# Altium PCB 9269_PCB1.PcbDoc (part 2 of 2)
Units mil, origin at the board's own origin, x right, y up, seen from the top; angles counter-clockwise.
Board outline 2770 x 5319.52 mil, 2 copper layers (Top Layer, Bottom Layer), stack 62.2 mil thick; 87 components, 63 nets, 294 pads, 108 vias.
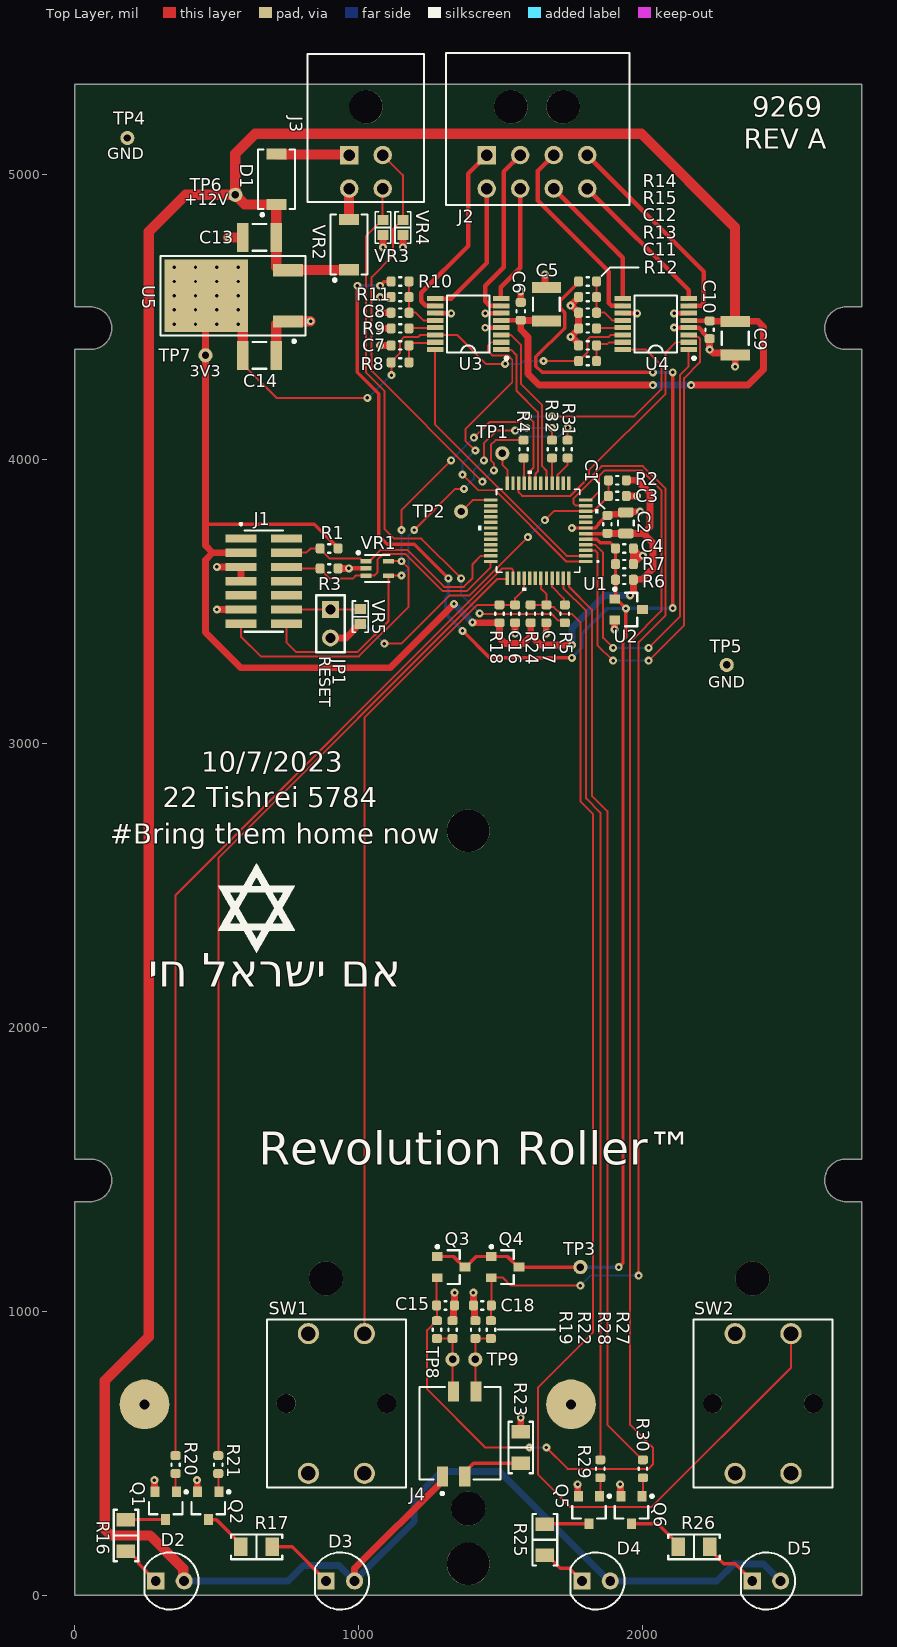
[diagram p0: Top Layer view]

## Part data (continued)
VR1: "ESDALC Series 4 Channel 6.1V Uni-Directional Transil ESD Protection SOT-323-5L", Breakdown Voltage=7.2V, Case/Package=SOT-323, Leakage Current=1uA, Manufacturer=STMicroelectronics, Manufacturer Part Number=ESDALC6V1W5, Max Operating Temperature=150°C, Max Power Dissipation=25W, Min Breakdown Voltage=6.1V, Min Operating Temperature=-40°C, Operating Supply Voltage=3V, Package Quantity=3000, Peak Pulse Current=15A, Power Line Protection=No, Supplier Part Number 1=511-ESDALC6V1W5, Test Current=1mA, Category="TVS Diodes", Depth=1.35mm, Diode Type=ZENER, Direction=Unidirectional, ESD Protection=Yes, Height=1mm, Lead Free="Lead Free", Length=2.2mm, Max Breakdown Voltage=7.2V, Max Reverse Leakage Current=1uA, Mounting Technology="Surface Mount", Number of Channels=4, Number of Elements=4, Number of Unidirectional Channels=4, Packaging="Tape and Reel", Peak Pulse Power=25W, Pins=5, Polarity=Unidirectional, Pricing 1="1=0.36, 10=0.282, 50=0.282, 100=0.17, 1000=0.146, 10000=0.084 (USD)", Radiation Hardening=No, Reach SVHC Compliant=No, Reverse Breakdown Voltage=6.1V, Reverse Standoff Voltage=3V, RoHS=Yes, RoHS Compliant=Yes, Series="ESDA, TRANSIL™", Stock 1=2738, Supplier 1=Mouser, Termination=SMD/SMT, Voltage Rating (DC)=6.1V, Weight=0.00019oz, Width=1.35mm, Working Voltage=3V
VR2: library part "TVS Diode Unidirectional", "400 W 12 V Uni Directional Surface Mount Transient Voltage Suppressor Diode", Breakdown Voltage=14.7V, Case/Package=SMA, Clamping Voltage=19.9V, Current=201A, Leakage Current=1uA, Manufacturer="Vishay Semiconductors", Manufacturer Part Number=SMAJ12A-E3/61, Max Forward Surge Current (Ifsm)=40A, Max Operating Temperature=150°C, Max Power Dissipation=400W, Max Surge Current=20.1A, Min Breakdown Voltage=13.3V, Min Operating Temperature=-55°C, Operating Supply Voltage=12V, Package Quantity=1800, Power Line Protection=No, Supplier Part Number 1=625-SMAJ12A-E3, Test Current=1mA, Category="TVS Diodes", Clamping Voltage-Max=19.9V, ComponentLink1Description=https://datasheet.ciiva.com/26322/548547-26322536.pdf?src-supplier=Element14, ComponentLink1URL=https://datasheet.ciiva.com/26322/548547-26322536.pdf?src-supplier=Element14, ComponentLink2Description=https://datasheet.ciiva.com/16199/smaj50a-16199669.pdf?src-supplier=Future+Electronics, ComponentLink2URL=https://datasheet.ciiva.com/16199/smaj50a-16199669.pdf?src-supplier=Future+Electronics, ComponentLink3Description=https://datasheet.ciiva.com/28409/548547-28409622.pdf?src-supplier=Element14, ComponentLink3URL=https://datasheet.ciiva.com/28409/548547-28409622.pdf?src-supplier=Element14, Diode Type=ZENER, Direction=Unidirectional, Height=2.09mm, Lead Free="Lead Free", Length=4.5mm, Max Breakdown Voltage=14.7V, Max Reverse Leakage Current=1uA, Number of Channels=1, Number of Elements=1, Number of Unidirectional Channels=1, Packaging="Tape and Reel", Peak Pulse Current=20.1A, Peak Pulse Power=400W, Pins=2, Polarity=Unidirectional, Power Dissipation=400W, Pricing 1="1=0.42, 10=0.302, 50=0.302, 100=0.137, 1000=0.091, 1800=0.077, 9000=0.07, 10000=0.07, 23400=0.065, 48600=0.063 (USD)", Radiation Hardening=No, Reach SVHC Compliant=Unknown, Reverse Breakdown Voltage=13.3V, Reverse Standoff Voltage=12V, RoHS=Yes, RoHS Compliant=Yes, Series=TransZorb®, Stock 1=44832, Supplier 1=Mouser, Termination=SMD/SMT, Voltage=12V, Voltage Rating (DC)=12V, Width=2.79mm
VR3 VR4 VR5: "ESD Suppressor Multilayer Varistor 5V Automotive 2-Pin Case 0603(1608Metric) T/R", Case Code (Imperial)=0603, Case Code (Metric)=1608, Clamping Voltage=20V, Current Rating=50nA, Manufacturer=Bourns, Manufacturer Part Number=CG0603MLC-05E, Max Operating Temperature=85°C, Max Voltage Rating (DC)=5V, Min Operating Temperature=-40°C, Package Quantity=1, Supplier Part Number 1=652-CG0603MLC-05E, Voltage Rating (AC)=8V, Case/Package=0603, Category=Varistors, ComponentLink1Description=https://datasheet.ciiva.com/1278/1785244-1278701.pdf?src-supplier=Element14, ComponentLink1URL=https://datasheet.ciiva.com/1278/1785244-1278701.pdf?src-supplier=Element14, ComponentLink2Description=https://datasheet.ciiva.com/22696/1785244-22696318.pdf?src-supplier=Element14, ComponentLink2URL=https://datasheet.ciiva.com/22696/1785244-22696318.pdf?src-supplier=Element14, ComponentLink3Description=https://datasheet.ciiva.com/8084/mlc-8084047.pdf?src-supplier=Avnet, ComponentLink3URL=https://datasheet.ciiva.com/8084/mlc-8084047.pdf?src-supplier=Avnet, ComponentLink4Description=https://datasheet.ciiva.com/6991/mlc-6991836.pdf?src-supplier=Digikey, ComponentLink4URL=https://datasheet.ciiva.com/6991/mlc-6991836.pdf?src-supplier=Digikey, ComponentLink5Description=https://datasheet.ciiva.com/6991/mlc-6991832.pdf?src-supplier=Digikey, ComponentLink5URL=https://datasheet.ciiva.com/6991/mlc-6991832.pdf?src-supplier=Digikey, Contact Plating=Tin, Depth=0.8mm, Leakage Current=50nA, Length=1.6mm, Number of Channels=1, Number of Circuits=1, Operating Supply Voltage=5V, Packaging="Tape and Reel", Pins=2, Pricing 1="1=0.36, 10=0.232, 50=0.232, 100=0.139, 1000=0.1, 5000=0.094, 10000=0.086, 25000=0.08, 50000=0.072, 100000=0.069 (USD)", Radiation Hardening=No, Reach SVHC Compliant=No, RoHS=Yes, RoHS Compliant=Yes, Series=MLC, Stock 1=20474, Supplier 1=Mouser, Termination=SMD/SMT, Thickness=0.8mm, Voltage=5V, Voltage Rating (DC)=5V, Width=0.8mm, Working Voltage=5V

## Free pads (board coordinates)
  round 150 hole 150 unplated: 1(1385,110) 3(1385,2691)
  round 120 hole 120 unplated: 2(1385,305) 6(884,1115) 7(2386,1115)
  round 175 hole 35 paste-87.5: 4(245,672) 5(1747,672)

## Via types
v1: diameter 28, hole 12, Top Layer to Bottom Layer, tented both sides, 108 vias

## Nets (pads, with @x,y where several pads share a name; then routed paths per layer and width w, separated by ;. In a path a pad name is that pad's centre, name@x,y a point inside that pad or via, vN(x,y) a via of type N, cw(c..) or ccw(c..) an arc to the next point about the centre after c; other vN are vias at no path point)
3V3: C1.2 C2.2 C14.2 J1.3 R1.1 R2.1 R6.1 R8.1 R12.1 R18.2 R24.2 TP7.1 U1.6 U3.14 U4.14 U5.3@462.6,4574.45 | length 6406.5
  Top Layer w7: C14.2 590.94,4333.5 607.13,4317.32 607.68,4317.32 710,4215 v1(1030,4215) ; v1(1115,4295) 1114.25,4295.75 1114.25,4339.25 R8.1 1113.5,4341.97 1145,4373.46 1145,4415 1160,4430 1210,4430 1216.61,4436.61 1345.8,4436.61 1447.42,4335 v1(1515,4335) ; v1(1650,4345) 1773.9,4345 1805,4376.1 1805,4420 1815,4430 1880,4430 1886.61,4436.61 U4.14
  Top Layer w12: 460,3775 465,3770 843.46,3770 926.5,3686.97 R1.1 ; U1.6 1873.98,3737.48 C1.2
  Top Layer w24: U5.3@462.6,4574.45 460,4571.85 TP7.1 460,3775 460,3695 485,3670 ; J1.3 485,3670 ; v1(1335,3490) 1110,3265 585,3265 460,3390 460,3645 485,3670 ; v1(1400,3425) 1401.08,3425 1402.58,3423.5 R18.2 1495,3370 1515.06,3349.94 1534.94,3349.94 1535,3350 1580,3350 1605,3375 ; R24.2 1605,3375 ; v1(1750,3345) 1640,3345 1610,3375 1605,3375 ; C1.2 1875.45,3738.05 1939.55,3738.05 C2.2 2002.4,3737.6 ; R2.1 1980,3925 2025,3880 2025,3760.2 2002.4,3737.6 ; v1(1955,3520) 1955,3521.08 1966.5,3532.58 R6.1 1968.13,3576.63 1996.63,3576.63 2035,3615 2035,3705 2002.4,3737.6
  Top Layer w36: U5.3@462.6,4574.45 480.99,4574.45 590.94,4464.5 C14.2
  Bottom Layer w7: v1(1030,4215) 1032.5,4215 1112.5,4295 v1(1115,4295) ; v1(1515,4335) 1570.49,4335 1580.49,4345 v1(1650,4345)
  Bottom Layer w24: v1(1335,3490) v1(1400,3425) ; v1(1750,3345) 1750,3405 1864.23,3519.23 1954.23,3519.23 v1(1955,3520)
  other v1: 350,4475 425,4475 500,4475 575,4475 350,4525 425,4525 500,4525 575,4525 350,4575 425,4575 500,4575 575,4575 350,4625 425,4625 500,4625 575,4625 350,4675 425,4675 500,4675 575,4675
12V: C5.2 C6.2 C9.2 C10.2 C13.2 D1.1 D2.2 D3.2 D4.2 D5.2 J4.1 TP6.1 U3.5 U4.5 U5.2 VR2.1 | length 13138.6
  Top Layer w16: U3.5 U3.5@1501.5,4488.15 ; U3.5@1502,4488.65 U3.5@1501.5,4488.15 ; C6.2@1572.84,4491.35 C6.2 1569.65,4488.15 U3.5@1501.5,4488.15 ; U4.5 2161.58,4487.35 C10.2@2234.14,4487.35
  Top Layer w24: D3.2 985,93.7 1293.94,402.65 J4.1 ; C6.2@1568.78,4489.72 C6.2 ; C5.2@1625,4478.26 C5.2@1632.69,4485.94 ; C5.2 1658.72,4487.22 1571.28,4487.22 C6.2 ; v1(2035,4260) 1635,4260 1595,4300 1595,4430 1570,4455 C6.2 ; v1(2170,4260) 2370,4260 2425,4315 2425,4465 2405,4485 C9.2@2324.06,4485 ; C10.2 2236.22,4485.28 2323.78,4485.28 C9.2@2324.06,4485 ; C9.2 C9.2@2324.06,4485
  Top Layer w36: D2.2 381.6,53.4 381.6,93.4 265,210 126.09,210 105,231.09 105,755 260,910 260,4800 390,4930 TP6.1 ; VR2.1 964.29,4665.71 750.71,4665.71 U5.2 718.5,4665 709.06,4674.45 C13.2 709.53,4780.47 709.53,4895.94 D1.1 598.58,4896.42 TP6.1 ; C9.2@2323.78,4485.28 2323.78,4816.22 1995,5145 635,5145 565,5075 TP6.1
  Bottom Layer w24: D2.2 750,50 805,105 930,105 D3.2 1195,260 1195,340 1290,435 1495,435 1880,50 D4.2 2260,50 2320,110 2425,110 D5.2 ; v1(2035,4260) v1(2170,4260)
AGITATOR1+: J2.1 U3.10 | length 665.9
  Top Layer w16: U3.10 1268,4539.83 1234.98,4539.83 1220,4554.81 1220,4585 1385,4750 1385,5005 J2.1
AGITATOR1-: J2.5 U3.9 | length 495.1
  Top Layer w16: U3.9 1324.57,4564.57 1450,4690 J2.5
AGITATOR2+: J2.3 U4.10 | length 700.6
  Top Layer w16: J2.3 1630,5014 1630,4910 1880,4660 1880,4549.21 1889.37,4539.83 1928,4539.83 U4.10
AGITATOR2-: J2.7 U4.9 | length 488
  Top Layer w16: J2.7 1928.86,4709.14 U4.9
AUGER1+: J2.2 U3.7 | length 628.7
  Top Layer w16: U3.7 1500.28,4539.83 1460.17,4539.83 1445,4555 1445,4610 1510,4675 1510,5012 J2.2
AUGER1-: J2.6 U3.8 | length 416.2
  Top Layer w16: U3.8 1500.86,4564.57 1500,4565.43 1500,4605 1568,4673 J2.6
AUGER2+: J2.4 U4.7 | length 748.7
  Top Layer w16: J2.4 2215,4659 2215,4550 2204.83,4539.83 2162,4539.83 U4.7
AUGER2-: J2.8 U4.8 | length 535.4
  Top Layer w16: J2.8 2161.14,4594.86 U4.8
GND: C1.1 C2.1 C3.1 C4.1 C5.1 C6.1 C7.1 C8.1 C9.1 C10.1 C11.1 C12.1 C13.1 C14.1 C15.1 C16.1 C17.1 C18.1 J1.5 J1.7 J1.11 J3.3 JP1.2 Q1.2 Q2.2 Q5.2 Q6.2 R3.2 R7.1 R9.2 R11.1 R13.2 R15.1 R22.2 R23.1 R28.2 SW1.3 SW2.3 TP4.1 TP5.1 U1.7 U2.2 U3.4 U3.6 U3.11 U4.4 U4.6 U4.11 U5.1 VR1.2 VR2.2 VR3.2 VR4.2 VR5.2 | length 2958.1
  Top Layer w12: v1(1750,3757) 1750.17,3757.17 U1.7 1832.17,3757.17 1845,3770 1845,3773.46 1873.03,3801.5 C1.1
  Top Layer w16: v1(965,3615) VR1.2 ; U3.11@1269.24,4513 v1(1325,4513) ; C15.1 C15.1@1336.75,1020.25 ; v1@1336.75,1064.75 v1(1337,1065) ; v1(1445,4462) U3.4@1500.94,4462 ; v1@1445,4510 1448.39,4513.39 U3.6 U3.6@1502,4514.24 ; C6.1@1568.03,4551.5 C6.1 ; U4.11 1929.05,4513.19 1979.81,4513.19 v1(1980,4513) ; v1(2110,4463) 2110.4,4462.6 2160.74,4462.6 U4.4 2162,4461.35 2198.65,4461.35 2210,4450 2210,4446.54 2233.03,4423.5 C10.1 ; v1(2110,4513) 2110.19,4513.19 2160.95,4513.19 U4.6
  Top Layer w24: v1(280,405) 280.77,404.23 280.77,365.46 Q1.2 ; v1(430,405) 430.77,404.23 430.77,365.46 Q2.2 ; v1(500,3470) J1.11 ; v1(500,3620) J1.5 J1.7 ; JP1.2 954.61,3370 1003.03,3418.43 VR5.2 ; R3.2 v1(965,3615) ; v1(1075,4400) C7.1 ; v1(1075,4460) R9.2 ; v1(1075,4515) C8.1 ; v1(1075,4570) R11.1 ; v1(1085,4745) VR3.2 ; v1(1155,4745) VR4.2 ; R22.2 1333.25,969.74 1333.25,1016.75 C15.1 ; C15.1@1336.75,1020.25 v1@1336.75,1064.75 ; v1(1403,1065) 1403.25,1064.75 1403.25,1020.25 C18.1 1406.75,1016.75 1406.75,969.74 R28.2 ; v1(1550,3385) C16.1 ; C6.1@1568.03,4551.5 1570,4553.46 v1(1570,4590) ; R23.1 v1(1570,625) ; v1(1655,4650) 1655,4609.06 C5.1 ; v1(1660,3385) C17.1 ; v1@1745.77,4540.77 v1(1745,4540) ; v1(1770,390) 1770.77,389.23 1770.77,350.46 Q5.2 ; C11.1 C11.1@1773.5,4401.97 ; C11.1@1773.5,4406.97 1751.24,4429.23 1745.77,4429.23 v1(1745,4430) 1745.47,4430 1773.5,4458.03 R13.2 C12.1 1773.5,4516.97 1751.24,4539.23 1745.77,4539.23 v1(1745,4540) ; R15.1 1773.5,4568.03 1745.47,4540 v1(1745,4540) ; C1.1 1878.75,3805.24 1923,3805.24 1930.16,3812.4 C2.1 1941.83,3814.23 1989.23,3814.23 v1(1990,3815) ; v1(1900,3400) U2.2@1900,3431.22 ; v1(1920,390) 1920.77,389.23 1920.77,350.46 Q6.2 ; C3.1 v1(1980,3870) ; C4.1 C4.1@1966.5,3683.03 ; C10.1 v1(2235,4385) 2236.08,4385 2247.45,4373.63 2317.31,4373.63 C9.1 v1(2325,4325) ; C4.1@1966.5,3683.03 R7.1 1966.5,3631.97 1993.76,3659.23 1999.23,3659.23 v1(2000,3660) 1999.23,3660.77 1988.76,3660.77 C4.1@1966.5,3683.03
  Top Layer w36: v1(540,4780) C13.1 ; C14.1 709.05,4474.45 718.5,4483.9 U5.1 751.1,4485 v1(830,4485) ; VR2.2@965,4848.58 965.5,4849.08 965.5,4951.5 J3.3
  other v1: 1445,4513
NetC7_2: C7.2 R8.2 U3.15 | length 149.9
  Top Layer w7: R8.2@1176.5,4345 C7.2 C7.2@1179.51,4403.01 ; C7.2@1179.51,4408.01 1265.85,4408.01 U3.15
NetC8_2: C8.2 R10.2 R11.2 U3.12 | length 213.6
  Top Layer w7: R10.2 R11.2 C8.2 1200,4515 1225,4490 1227.2,4487.8 U3.12
NetC11_2: C11.2 R12.2 U4.15 | length 154.7
  Top Layer w7: R12.2 C11.2 1841.5,4405 1875,4405 1880,4410 U4.15@1927.83,4410 ; U4.15@1925.85,4408.01 U4.15@1927.83,4410 ; U4.15 U4.15@1927.83,4410
NetC12_2: C12.2 R14.2 R15.2 U4.12 | length 213.6
  Top Layer w7: R14.2 R15.2 C12.2 1865,4515 1890.02,4489.98 1892.2,4487.8 U4.12
NetC15_2: C15.2 Q3.2 R19.1 U1.12 | length 5207.2
  Top Layer w7: Q3.2 1273.5,1114.72 C15.2 1274.25,1019.25 1274.25,967.24 R19.1 1273.03,966.5 1240,933.46 1240,725 1445,520 v1(1600,520) ; v1(1660,520) 1735,445 2020,445 2035,460 2035,520 1955,600 1955,3355 2065,3465 2065,3890 1995,3960 1865,3960 1845,3940 1845,3884.67 1815.93,3855.59 U1.12
  Bottom Layer w7: v1(1600,520) v1(1660,520)
NetC16_2: C16.2 R18.1 SW1.1 U1.40 | length 2970.4
  Top Layer w7: SW1.1 1019.43,3089.83 1416.09,3486.5 R18.1 C16.2 1550,3510 1581.89,3541.89 U1.40
NetC17_2: C17.2 R24.1 SW2.1 U1.43 | length 4663.5
  Top Layer w7: R24.1 C17.2 ; U1.43 1640.94,3544.06 1660,3525 C17.2 ; SW2.1 2521.43,801.43 2030,310 1745,310 1630,425 1630,730 1825,925 1825,2750 1780,2795 1780,3425 1750,3455 1710,3455 1686.6,3478.4 1668.1,3478.4 C17.2
NetC18_2: C18.2 Q4.2 R27.1 U1.11 | length 3982.4
  Top Layer w7: R27.1 1465.75,967.24 1465.75,1019.25 C18.2 1466.5,1117.48 Q4.2 1507.4,1117.6 1535,1090 v1(1780,1090) ; U1.11 1764.09,3835.91 1755,3845 1755,3860 1825,3930 1825,3945 1855,3975 2000,3975 2080,3895 2080,3450 1985,3355 v1(1985,1125)
  Bottom Layer w7: v1(1780,1090) 1815,1125 v1(1985,1125)
NetD1_2: D1.2 J3.1 | length 255
  Top Layer w36: D1.2@711.79,5071.79 J3.1@964.21,5071.79
  Top Layer w48: J3.1@964.21,5071.79 J3.1
NetD2_1: D2.1 R16.2 | length 153.6
  Top Layer w12: R16.2 188.86,154.88 225,118.74 225,110 D2.1
NetD3_1: D3.1 R17.2 | length 239.6
  Top Layer w12: R17.2 765,170 D3.1
NetD4_1: D4.1 R25.2 | length 167.2
  Top Layer w12: R25.2 1663.86,139.88 1708.74,95 1740,95 D4.1
NetD5_1: D5.1 R26.2 | length 205.5
  Top Layer w12: R26.2 2252.74,152.38 2252.74,142.26 2285,110 2325,110 D5.1
NetJ1_13: J1.13 R32.2 VR1.5 | length 1842.8
  Top Layer w7: J1.13 584.88,3375.12 655,3305 1000,3305 1175,3480 1175,3615 v1(1150,3640) 1149.7,3640.3 VR1.5@1116.18,3640.3 ; VR1.5 VR1.5@1116.18,3640.59 ; v1(1150,3750) 1150,3820 v1(1325,3995) ; v1(1405,4075) 1460,4130 1570,4130 v1(1590,4110) ; R32.2 v1(1680,4110)
  Bottom Layer w7: v1(1150,3640) v1(1150,3750) ; v1(1325,3995) v1(1405,4075) ; v1(1590,4110) v1(1680,4110)
NetJ1_14: J1.14 R31.2 VR1.4 | length 1671.1
  Top Layer w7: J1.14 745.12,3354.88 780,3320 995,3320 1104.37,3429.37 VR1.4 1104.67,3589.7 1149.7,3589.7 v1(1150,3590) ; v1(1195,3750) 1340,3895 v1(1370,3895) ; v1(1440,3995) 1440,4055 1485,4100 v1(1550,4100) ; R31.2 v1(1735,4110)
  Bottom Layer w7: v1(1150,3590) 1175,3615 1175,3730.4 1194.6,3750 v1(1195,3750) ; v1(1370,3895) 1405,3930 1405,3960 v1(1440,3995) ; v1(1550,4100) 1550,4099.6 1569.6,4080 1705,4080 v1(1735,4110)
NetJ3_2: J3.2 R4.2 VR4.1 | length 1660.2
  Top Layer w7: J3.2 1155,4999 VR4.1 1153.03,4841.57 1120,4808.54 1120,4715 1045,4640 1045,4310 v1(1435,3920) ; v1(1475,3960) 1475,3985 1465,3995 1465,4050 1481.5,4066.5 R4.2
  Bottom Layer w7: v1(1435,3920) v1(1475,3960)
NetJ3_4: J3.4 R5.2 VR3.1 | length 2056.9
  Top Layer w7: J3.4 1084,4842.57 VR3.1 1083.03,4841.57 1025,4783.54 1025,4305 1090,4240 1090,3755 1125,3720 1220,3720 v1(1360,3580) ; v1(1425,3456.5) 1426.5,3455 1678.1,3455 1702.45,3430.65 1717.85,3430.65 R5.2
  Bottom Layer w7: v1(1360,3580) 1360,3521.5 v1(1425,3456.5)
NetJ4_2: J4.2 R23.2 | length 225.9
  Top Layer w12: J4.2 1372.68,434.14 1403.54,465 1569.88,465 R23.2
NetJ4_3: J4.3 R27.2 R28.1 TP9.1 | length 241.7
  Top Layer w7: J4.3 1410,719.66 TP9.1 R28.1 R27.2
NetJ4_4: J4.4 R19.2 R22.1 TP8.1 | length 242.3
  Top Layer w7: R19.2 R22.1 TP8.1 1330,720.92 J4.4
NetQ1_1: Q1.1 R20.1 | length 65.9
  Top Layer w7: R20.1 355,366.02 Q1.1
NetQ1_3: Q1.3 R16.1 | length 140.5
  Top Layer w12: R16.1 181.26,266.38 Q1.3
NetQ2_1: Q2.1 R21.1 | length 65.9
  Top Layer w7: R21.1 505,366.02 Q2.1
NetQ2_3: Q2.3 R17.1 | length 160
  Top Layer w12: Q2.3 471.38,265 498.74,265 584.88,178.86 R17.1
NetQ5_1: Q5.1 R29.1 | length 66
  Top Layer w7: Q5.1 1850,351.22 R29.1
NetQ5_3: Q5.3 R25.1 | length 155.5
  Top Layer w12: R25.1 1656.26,251.38 Q5.3
NetQ6_1: Q6.1 R30.1 | length 66
  Top Layer w7: Q6.1 2000,351.22 R30.1
NetQ6_3: Q6.3 R26.1 | length 203.8
  Top Layer w12: Q6.3 2052.36,251.38 2124.88,178.86 R26.1
NetR4_1: R4.1 U1.21 | length 89.6
  Top Layer w7: R4.1 1580.94,4002.56 1580.94,3915.59 U1.21
NetR5_1: R5.1 U1.45 | length 112
  Top Layer w7: U1.45 1680.32,3549.69 1721.36,3508.64 1721.36,3490.14 R5.1
NetR9_1: R9.1 U3.13 | length 93.3
  Top Layer w7: R9.1 1177.6,4461.1 1267.76,4461.1 U3.13
NetR13_1: R13.1 U4.13 | length 93.3
  Top Layer w7: R13.1 1837.6,4461.1 1927.76,4461.1 U4.13
NetR20_2: R20.2 U1.38 | length 3669.4
  Top Layer w7: R20.2 355,2465 1505,3615 1537.51,3615 1542.52,3609.99 U1.38
NetR21_2: R21.2 U1.37 | length 3529.5
  Top Layer w7: R21.2 505,2595.2 1487.4,3577.6 1520.44,3577.6 U1.37
NetR29_2: R29.2 U1.47 | length 3157.5
  Top Layer w7: U1.47 1719.69,3545.31 1800,3465 1800,2805 1850,2755 R29.2
NetR30_2: R30.2 U1.48 | length 3212.6
  Top Layer w7: U1.48 1739.86,3579.51 1739.86,3550.14 1820,3470 1820,2815 1875,2760 1875,599.53 1998.03,476.5 R30.2
NetTP1_1: TP1.1 U1.24 | length 112.7
  Top Layer w7: TP1.1 1505,3980 1522.83,3962.17 U1.24
NetTP2_1: TP2.1 U1.25 | length 113.5
  Top Layer w7: TP2.1@1365,3820 1400.3,3855.3 1463.48,3855.3 U1.25
NetU1_1: U1.1 U3.2 | length 1236.6
  Top Layer w7: v1@1365.98,3945.98 v1(1365,3945) 1420,3890 1480,3890 1730.94,3639.06 U1.1 ; v1(1410,4030) 1375,4065 1375,4105 1540,4270 1540,4350 1525,4365 1469.32,4365 1455,4379.32 1455,4400 1466.02,4411.02 U3.2
  Bottom Layer w7: v1(1365,3945) 1365,3985 v1(1410,4030)
NetU1_2: U1.2 U3.16 | length 985.4
  Top Layer w7: U3.16 1268.86,4121.14 1731.26,3658.74 U1.2
NetU1_3: U1.3 U4.3 | length 1825.9
  Top Layer w7: U1.3 1831.57,3678.43 1840,3670 1840,3345 v1(1895,3290) ; v1(2020,3290) 2145,3415 2145,4285 2200.18,4340.19 2200.18,4424.23 2194.03,4430.38 2190.29,4430.38 2189.41,4431.26 2166.5,4431.26 U4.3
  Bottom Layer w7: v1(1895,3290) v1(2020,3290)
NetU1_4: U1.4 U4.1 | length 1656.6
  Top Layer w7: U1.4 1831.89,3698.11 1860,3670 1860,3370 v1(1895,3335) ; v1(2020,3335) 2130,3445 2130,4295 2160,4325 2160,4384.29 U4.1
  Bottom Layer w7: v1(1895,3335) v1(2020,3335)
NetU1_17: U1.17 U3.3 | length 608.2
  Top Layer w7: U3.3 1501.62,4436.13 1536.08,4436.13 1570,4402.22 1570,4265 1645,4190 1645,3975 1660.63,3959.37 U1.17
NetU1_19: U1.19 U3.1 | length 547.4
  Top Layer w7: U3.1 1502.66,4383.92 1536.08,4383.92 1555,4365 1555,4240 1630,4165 1630,3956 1621.26,3947.26 U1.19
NetU1_20: U1.20 U4.16 | length 1002.7
  Top Layer w7: v1(1595,4150) 1615,4130 1615,3970 1601.57,3956.57 U1.20 ; v1(1680,4150) 1970,4150 2065,4245 2065,4330 2009.57,4385.43 U4.16
  Bottom Layer w7: v1(1595,4150) v1(1680,4150)
NetU1_22: U1.22 U4.2 | length 966.8
  Top Layer w7: U1.22 1562.2,3882.8 1575,3870 1745,3870 1775,3900 1810,3935 1810,3960 2080,4230 2080,4375 ; 2085,4380 2080,4375 ; U4.2 2116.02,4411.02 2080,4375
NRST: C3.2 J1.12 JP1.1 R2.2 U1.10 VR5.1 | length 1560.3
  Top Layer w7: J1.12 JP1.1 1003.43,3470 VR5.1 ; v1(1090,3350) 1150,3350 1320,3520 1390,3520 v1(1595,3725) ; v1(1655,3785) 1686.22,3816.22 U1.10 1799.47,3817.26 1827.73,3817.26 1878.5,3868.03 C3.2 R2.2
  Bottom Layer w7: JP1.1 970,3470 v1(1090,3350) ; v1(1595,3725) v1(1655,3785)
SWCLK: J1.6 R3.1 U1.36 VR1.3 | length 908.4
  Top Layer w7: J1.6 750.12,3615 861.54,3615 R3.1@863.5,3613.03 ; R3.1 R3.1@863.5,3613.03 ; VR1.3 VR1.3@1025.04,3590 ; U1.36 1463.78,3618.78 1380,3535 1295,3535 1165,3665 1085,3665 1065,3645 1065,3600 1055,3590 VR1.3@1025.04,3590 ; R3.1@863.5,3613.03 896.54,3580 980,3580 990,3590 VR1.3@1025.04,3590
SWDIO: J1.4 R1.2 U1.35 VR1.1 | length 891.2
  Top Layer w7: J1.4 815,3670 830,3685 R1.2 ; R1.2@863.5,3686.97 R1.2 ; U1.35 1428.74,3658.74 1400,3630 1400,3580 1370,3550 1300,3550 1170,3680 1076.85,3680 1037.44,3640.59 VR1.1 1013.82,3640.59 1005,3649.41 1005,3650 896.54,3650 863.5,3683.03 R1.2
USART2_RX: R32.1 U1.16 | length 88.9
  Top Layer w7: U1.16 R32.1@1680.32,4003.5
USART2_TX: R31.1 U1.15 | length 103.4
  Top Layer w7: U1.15 1700,3945 1735,3980 R31.1
VREF_2V5: C4.2 Q3.1 Q3.3 Q4.1 Q4.3 R6.2 R7.2 R10.1 R14.1 TP3.1 U1.5 U2.1 | length 7493.5
  Top Layer w12: v1(995,4610) 995,4305 1070,4230 1070,3730 1100,3700 1195,3700 v1(1315,3580) ; v1(1075,4610) 1090,4625 R10.1 ; Q3.1 1333.27,1192.4 1370.67,1155 Q3.3 1376.57,1155 1413.98,1192.4 Q4.1 1523.27,1192.4 1560.67,1155 Q4.3 TP3.1 ; v1(1365,3395) 1460,3300 v1(1750,3300) ; R14.1 1773.5,4623.03 1710,4559.53 1710,4530 1724.18,4515.82 1724.18,4460.88 1623,4359.69 1623,4327 1645,4305 v1(2035,4305) ; U1.5 1837.2,3717.8 1850,3705 1884.46,3705 1903.5,3685.95 C4.2 R7.2 R6.2 ; U2.1 1911.13,3497.65 1916.13,3497.65 v1(1940,3473.78) 1940,3372.93 1930,3362.93 1930,1170.03 v1(1915,1155) ; U2.1@1902,3509.26 1903.7,3510.96 R6.2@1903.7,3574.81 ; v1(2105,3475) v1(2105,4305)
  Bottom Layer w12: v1(995,4610) v1(1075,4610) ; v1(1315,3580) 1315,3520 1305,3510 1305,3455 v1(1365,3395) ; v1(1750,3300) 1785,3335 1785,3385 1873.78,3473.78 v1(1940,3473.78) 1940.61,3474.39 2104.39,3474.39 v1(2105,3475) ; TP3.1 v1(1915,1155) ; v1(2035,4305) v1(2105,4305)
pads on no net: J1.1 J1.2 J1.8 J1.9 J1.10 J2.9 J3.9 SW1.2 SW1.4 SW1.5 SW1.6 SW2.2 SW2.4 SW2.5 SW2.6 U1.8 U1.9 U1.13 U1.14 U1.18 U1.23 U1.26 U1.27 U1.28 U1.29 U1.30 U1.31 U1.32 U1.33 U1.34 U1.39 U1.41 U1.42 U1.44 U1.46 U2.3 U5.3@391.73,4519.33 U5.3@391.73,4633.5 U5.3@521.65,4519.33 U5.3@521.65,4633.5

## Polygon pours and split planes (outlines as drawn)
GND on Bottom Layer "NONET_L-01_P-001" (solid, pour order 1): 1000.42,215.42 1275,490 1525,490 1800,215 1845,213.85 2687.22,212.29 2735,259.98 2735,1325 2715,1325 cw(c2715,1462.5) 2715,1600 2735,1600 2735,4325 2715,4325 cw(c2715,4462.5) 2715,4600 2735,4600 2735,5190 2685,5240 80,5240 35,5195 35,4600 55,4600 cw(c55,4462.5) 55,4325 35,4325 35,1600 55,1600 cw(c55,1462.5) 55,1325 35,1325 35,265.03 82.82,217.12
3V3 on Bottom Layer "NONET_L-01_P-001" (solid, pour order 0): 295,4725 775,4725 775,4025 295,4025

## Silkscreen, mask and mechanical layers (free items; w line width, h text height)
Top Overlay:
  drawing of 7 lines, arcs and shapes, not listed
  text "9269" at 2385,5181.3 h120
  text "REV A" at 2355,5070 h120
  text "GND" at 115,5040.76 h70
  text "+12V" at 385,4880 h70
  text "3V3" at 405,4275.76 h70
  text "RESET" at 845.76,3305 h70 r270
  text "GND" at 2230,3180.76 h70
  text "10/7/2023" at 444.55,2876.3 h120
  text "22 Tishrei 5784" at 309,2751.3 h120
  text "#Bring them home now" at 124,2622.5 h120
  text "יח לארשי םא" at 258.18,2102.5 h200
  text "Revolution Roller™" at 647.8,1477 h200
Bottom Overlay:
  text "Design by" at 1614.1,2217.5 h120
  text "DMK Engineering Inc." at 1893.45,2082.5 h120
  text "www.dmkeng.com" at 1815.1,1947.5 h120
Board:
  the board outline again, w10
Mechanical 5:
  circle w10: c921.36,675.03 r85
  circle w10: c921.36,675.03 r20
  circle w10: c245.07,672.37 r20
  circle w10: c883.86,1115.03 r60
  circle w10: c245.07,672.37 r80
  circle w10: c921.36,675.03 r140
  circle w10: c1385,2691.15 r75
  circle w10: c1385,110.37 r75
  circle w10: c1385,304.52 r60
  circle w10: c2385.86,1115.01 r60
  circle w10: c2423.36,675.01 r85
  circle w10: c2423.36,675.01 r140
  circle w10: c1747.3,672.37 r80
  circle w10: c2423.36,675.01 r20
  circle w10: c1747.3,672.37 r20
  lines w10: 1258.37,0 1258.37,380.97 cw(c1386.64,-191.73) 1514.92,380.97 1514.92,0 ; 606.36,435.04 606.36,1229.42 cw(c883.86,1100.65) 1161.36,1229.42 1161.36,435.04 606.36,435.04 ; 1216.93,410.1 1216.93,723.94 1491.63,723.94 1491.63,410.1 1216.93,410.1 ; 1258.44,535.76 1448.52,535.76 1448.52,598.81 1258.44,598.81 1258.44,535.76 ; 1329.15,2341.85 1329.15,2557.34 cw(c1385,2691.15) 1520.74,2742.14 1805.63,2742.14 1805.63,2634.37 1518.42,2634.37 cw(c1385,2691.15) 1434.96,2555.03 1434.96,2341.85 1329.15,2341.85 ; 2108.36,435.01 2663.36,435.01 2663.36,1229.4 ccw(c2385.86,1100.63) 2108.36,1229.4 2108.36,435.01
Mechanical 11:
  lines w7: 795,5320 795,4870 1975,4870 1975,5320